# Altium PCB EFR32xG1x_DISC_WIDEBAND_REF_DES_A00.PcbDoc (part 2 of 2)
Units mm, origin at the board's own origin, x right, y up, seen from the top; angles counter-clockwise.
Board outline 30 x 45 mm, 4 copper layers (Top Layer, Signal Layer 2, Signal Layer 3, Bottom Layer), stack 1.606 mm thick; 90 components, 90 nets, 338 pads, 387 vias.
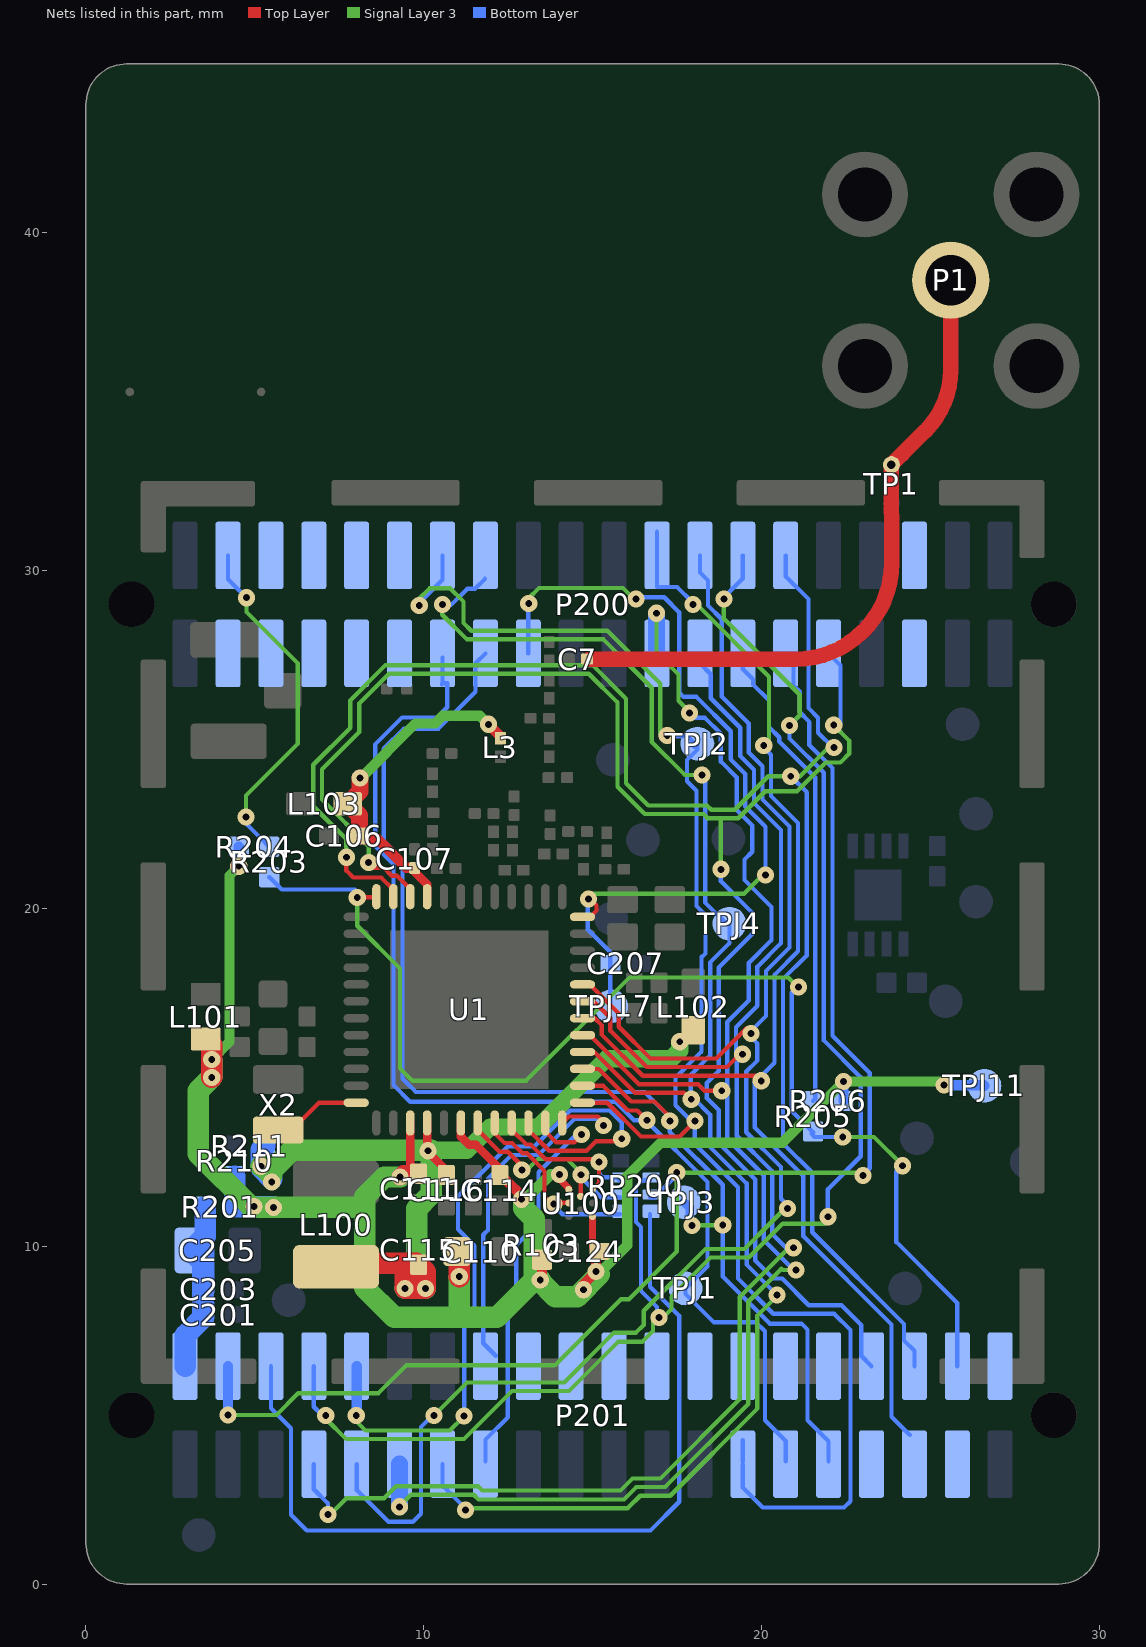
[diagram p4: the nets of this part, all layers, seen from the top]

## Via types
v1: diameter 0.508, hole 0.203, Top Layer to Bottom Layer, tented both sides, 387 vias

## Nets (pads, with @x,y where several pads share a name; then routed paths per layer and width w, separated by ;. In a path a pad name is that pad's centre, name@x,y a point inside that pad or via, vN(x,y) a via of type N, cw(c..) or ccw(c..) an arc to the next point about the centre after c; other vN are vias at no path point) (continued)
RADIO_PB15: U1.36 X2.1 | length 2.7
  Top Layer w0.127: X2.1@5.698,13.4 5.747,13.449 6.097,13.449 6.898,14.25 U1.36@8,14.25
RADIO_PC6: RP200.2 U1.43 U100.D2 | length 6.9
  Top Layer w0.127: U1.43@11.598,13.65 11.598,13.446 12.244,12.8 12.484,12.8 13.034,12.25 12.992,12.208 12.944,12.255 v1(12.903,12.255) ; U100.D2@14.648,11.55 14.648,12.051 14.584,12.116 14.596,12.128 14.609,12.116 v1(14.656,12.116)
  Signal Layer 3 w0.127: v1(12.903,12.255) 12.931,12.255 12.992,12.194 13.384,12.586 14.237,12.586 14.654,12.169 v1@14.601,12.116 ; v1(14.656,12.116) v1@14.601,12.116 ; v1@14.601,12.116 14.588,12.128 14.576,12.116 14.588,12.103 v1@14.601,12.116
  Bottom Layer w0.127: v1(14.656,12.116) 14.609,12.116 14.596,12.128 14.584,12.116 15.249,11.45 RP200.2@15.8,11.45
RADIO_PC7: RP200.1 U1.44 U100.C3 | length 5.7
  Top Layer w0.127: U1.44@12.1,13.65 12.098,13.35 12.392,13.056 12.617,13.056 12.922,12.751 13.056,12.751 13.576,12.23 13.576,11.472 v1@13.648,11.4 ; v1(13.85,11.25) 13.89,11.29 U100.C3@14.298,11.29
  Bottom Layer w0.127: v1@13.824,11.224 14.098,10.95 RP200.1@15.8,10.95
RADIO_PC8: RP200.3 U1.45 U100.E1 | length 5.1
  Top Layer w0.127: U1.45@12.6,13.65 12.598,13.45 13.038,13.01 13.165,13.01 13.602,12.573 v1@15.176,12.573 ; U100.E1@14.993,11.678 15.189,11.874 v1@15.189,12.471
  Bottom Layer w0.127: v1(15.189,12.497) 15.189,12.174 15.215,12.149 15.207,12.141 15.308,12.04 15.71,12.04 RP200.3@15.8,11.95
RADIO_PC9: P201.10 U1.46 | length 22.3
  Top Layer w0.127: U1.46@13.1,13.65 13.1,13.443 13.716,12.827 14.821,12.827 15.1,13.106 15.799,13.106 15.862,13.17 v1(15.862,13.183)
  Signal Layer 3 w0.127: v1(8.001,4.991) 7.861,4.991 7.848,4.978 8.28,4.547 10.772,4.547 11.189,4.964 v1(11.189,4.978)
  Bottom Layer w0.127: v1(8.001,4.991) 7.885,4.991 v1@8.014,5.119 ; P201.10@8.014,6.449 P201.10@8.015,6.45 ; v1@11.113,4.934 11.201,5.023 11.201,7.622 11.5,7.92 11.5,10.014 11.011,10.503 11.011,11.481 12.484,12.954 13.271,12.954 14.338,14.021 15.507,14.021 15.862,13.665 v1(15.862,13.183)
  Bottom Layer w0.305: v1@8.014,5.119 P201.10@8.014,6.449
RADIO_PC10: P201.15 U1.47 | length 12.5
  Top Layer w0.127: U1.47@13.6,13.65 13.6,13.4 13.919,13.081 14.459,13.081 14.668,13.291 v1(14.668,13.31)
  Bottom Layer w0.127: P201.15@11.825,3.635 11.825,4.275 12.484,4.934 12.484,8.234 12.738,8.488 12.738,10.033 13.399,10.693 13.399,12.192 14.516,13.31 v1(14.668,13.31)
RADIO_PC11: P201.16 U1.48 | length 11.3
  Top Layer w0.127: U1.48@14.098,13.65 U1.48@14.1,13.65 14.293,13.843 15.151,13.843 15.316,13.678 v1(15.316,13.576)
  Bottom Layer w0.127: P201.16@12.131,6.756 11.76,7.127 11.76,10.338 11.9,10.477 11.9,12 12.6,12.7 13.399,12.7 14.465,13.767 15.316,13.767 v1(15.316,13.576)
RADIO_PD13: P200.31 P201.34 U1.22 | length 49.9
  Top Layer w0.127: v1(8.369,21.361) 8.362,21.361 8.35,21.349 8.489,21.209 8.814,21.209 9.055,20.968 9.208,20.968 9.598,20.578 U1.22@9.598,20.35
  Signal Layer 3 w0.127: v1(8.369,21.361) 8.369,21.84 6.985,23.225 6.985,24.121 8.09,25.226 8.09,26.066 8.973,26.949 14.887,26.949 15.735,26.101 15.735,23.602 16.541,22.796 18.281,22.796 18.408,22.669 18.796,22.669 ; v1(18.796,21.158) 18.796,22.669 ; v1(22.136,25.425) 22.593,24.968 22.593,24.581 22.333,24.32 21.901,24.32 21.05,23.47 20.111,23.47 19.311,22.669 18.796,22.669
  Bottom Layer w0.127: v1@18.796,21.145 18.796,20.803 19.748,19.85 19.748,19.266 18.732,18.25 18.732,15.189 18.377,14.834 18.377,14.389 18.732,14.034 18.732,13.056 19.812,11.976 19.812,9.576 20.345,9.042 20.612,9.042 21.399,8.255 22.365,8.255 22.949,7.671 22.949,6.756 P201.34@23.255,6.45 ; v1(18.796,21.158) v1@18.86,21.158 ; P200.31@21.985,27.55 22.339,27.196 v1@22.339,25.463 ; v1(22.136,25.425) 22.149,25.425 v1@22.275,25.299
RADIO_PD14: P200.30 P201.36 U1.23 | length 52.3
  Top Layer w0.127: v1(7.709,21.514) 7.709,21.12 7.912,20.917 8.738,20.917 9.098,20.556 U1.23@9.1,20.35
  Signal Layer 3 w0.127: v1(7.709,21.514) 7.709,22.047 6.731,23.025 6.731,24.253 7.823,25.346 7.823,26.158 8.868,27.203 14.992,27.203 15.989,26.206 15.989,23.707 16.646,23.05 18.386,23.05 18.513,22.924 19.206,22.924 20.197,23.914 v1(20.866,23.914) 21.136,23.914 21.986,24.765 v1(22.149,24.765)
  Bottom Layer w0.127: P200.30@20.715,30.45 20.715,29.831 21.387,29.159 21.387,25.933 21.673,25.648 21.673,25.203 22.111,24.765 v1(22.149,24.765) ; v1(20.866,23.914) 21.336,23.444 21.336,18.605 20.637,17.907 20.637,13.043 21.5,12.18 21.5,10.415 24.219,7.696 24.219,7.214 24.525,6.907 P201.36@24.525,6.45
RADIO_PD15: P201.38 R203.1 R205.1 U1.24 | length 36.8
  Top Layer w0.127: v1(8.032,20.328) 8.522,20.328 8.558,20.364 8.585,20.337 U1.24@8.598,20.35
  Signal Layer 3 w0.127: v1(8.032,20.328) 8.032,19.488 9.296,18.224 9.296,15.265 9.665,14.897 13.03,14.897 16.091,17.958 20.79,17.958 v1@21.044,17.704 ; v1(22.403,13.233) 23.33,13.233 v1@24.168,12.395
  Bottom Layer w0.127: R203.1@5.425,20.925 5.431,20.925 5.795,20.561 7.963,20.561 8.032,20.492 v1(8.032,20.328) ; v1@21.057,17.678 20.892,17.513 20.892,14.008 R205.1@21.526,13.373 ; R205.1@21.48,13.335 21.563,13.235 v1@22.312,13.235 ; v1(24.168,12.383) 23.99,12.205 23.99,10.122 25.795,8.317 P201.38@25.795,6.45
  other v1: 21.095,17.678
RADIO_PF0: P200.14 P201.27 TPJ2.1 U1.1 | length 48.5
  Top Layer w0.127: U1.1@14.698,14.25 U1.1@14.7,14.25 14.998,14.25 15.43,14.249 16.434,13.246 17.577,13.246 v1@18.021,13.691
  Signal Layer 3 w0.127: v1(9.868,28.969) 9.868,29.172 10.171,29.475 10.784,29.475 11.176,29.083 11.176,28.448 11.405,28.219 15.436,28.219 17.005,26.65 v1@17.005,25.146
  Bottom Layer w0.127: v1(9.868,28.969) 9.868,29.043 10.555,29.73 P200.14@10.555,30.45 ; v1@17.209,25.26 v1(17.209,25.121) 17.234,25.095 17.818,25.095 TPJ2.1@17.958,24.956 ; TPJ2.1@17.907,24.88 TPJ2.1@18.003,24.784 ; v1(18.034,13.703) v1@18.021,13.703 ; TPJ2.1@18.1,24.88 18.1,24.704 17.793,24.397 17.793,23.768 18.075,23.485 18.075,20.072 18.339,19.808 18.339,18.669 18.237,18.567 ; 18.224,18.567 18.224,15.761 17.45,14.986 17.45,14.173 17.92,13.703 v1@18.021,13.703 ; P201.27@19.445,3.55 19.445,2.856 20.038,2.263 22.443,2.263 22.631,2.451 22.631,7.518 22.149,8.001 20.345,8.001 19.304,9.042 19.304,11.747 18.021,13.03 v1@18.021,13.703 ; P201.27@19.445,3.635 P201.27@19.445,4.255
RADIO_PF1: P200.13 P201.29 TPJ1.1 U1.2 | length 37.9
  Top Layer w0.127: U1.2@14.698,14.75 U1.2@14.7,14.75 15.311,14.75 16.04,14.021 16.319,14.021 v1(16.612,13.729)
  Bottom Layer w0.127: P200.13@10.541,26.632 10.554,26.645 P200.13@10.554,26.67 ; P200.13@10.541,26.67 P200.13@10.554,26.67 ; P200.13@10.554,27.432 P200.13@10.554,26.67 ; v1(16.612,13.729) v1@16.573,13.729 ; P201.29@20.715,3.635 20.715,4.235 20.1,4.85 20.1,7.484 19.837,7.747 18.593,7.747 17.75,8.59 TPJ1.1@17.75,8.75 18.402,9.402 18.402,11.9 v1@16.573,13.729 ; P200.13@10.554,26.67 10.693,26.67 10.693,25.959 10.389,25.654 9.36,25.654 8.56,24.854 8.56,21.844 9.106,21.298 9.106,14.77 9.601,14.275 15.675,14.275 16.221,13.729 v1@16.562,13.729 ; v1@16.562,13.729 16.568,13.735 v1@16.573,13.729 ; v1@16.562,13.729 v1@16.573,13.729
RADIO_PF2: P200.15 P201.31 TPJ3.1 U1.3 | length 40.9
  Top Layer w0.127: U1.3@14.7,15.25 15.179,15.25 16.142,14.287 16.828,14.287 17.272,13.843 17.259,13.83 17.285,13.805 v1(17.285,13.703)
  Signal Layer 3 w0.127: v1(17.945,10.617) 18.017,10.617 18.029,10.629 18.033,10.625 v1(18.85,10.625)
  Bottom Layer w0.127: P200.15@11.825,27.55 11.532,27.257 11.532,26.416 10.439,25.324 9.411,25.324 8.814,24.727 8.814,21.996 9.373,21.438 9.373,14.961 9.766,14.567 16.535,14.567 17.272,13.83 17.259,13.818 17.285,13.792 v1(17.285,13.703) 17.285,13.386 18.85,11.82 v1(18.85,10.625) 18.85,9.103 20.244,7.709 21.184,7.709 21.361,7.531 21.361,4.851 21.985,4.228 P201.31@21.985,3.635 ; v1@17.831,10.617 v1(17.945,10.617)
  Bottom Layer w0.254: TPJ3.1@17.7,11.3 17.869,11.131 17.869,10.693 v1(17.945,10.617)
RADIO_PF3: P200.16 P201.13 TPJ4.1 U1.4 | length 48.8
  Top Layer w0.127: U1.4@14.7,15.75 15.047,15.75 16.256,14.541 17.704,14.541 v1@17.907,14.338
  Signal Layer 3 w0.127: v1(10.55,29) 10.55,28.693 11.278,27.965 15.32,27.965 16.751,26.534 16.751,24.93 17.729,23.952 v1(18.237,23.952) ; v1(11.238,2.188) 11.298,2.248 16.04,2.248 16.408,2.616 17.297,2.616 19.875,5.194 19.875,7.95 20.485,8.56 v1(20.46,8.56)
  Bottom Layer w0.127: v1(10.55,29) 10.569,28.981 10.808,28.981 11.29,29.464 11.519,29.464 P200.16@11.811,29.756 ; P201.13@10.555,3.55 10.555,2.918 11.238,2.235 v1(11.238,2.188) ; v1(18.237,23.952) 18.329,23.86 18.329,20.177 18.923,19.583 TPJ4.1@19.025,19.583 ; TPJ4.1@19.05,19.55 19.05,18.974 18.479,18.402 18.479,15.646 17.907,15.075 17.907,14.376 17.996,14.376 18.479,13.894 18.479,12.941 19.558,11.862 19.558,9.461 v1(20.46,8.56)
  other v1: 17.92,14.351
RADIO_PF4: P200.23 P201.11 U1.5 | length 46.9
  Top Layer w0.127: U1.5@14.7,16.25 14.916,16.25 16.37,14.795 18.123,14.795 18.313,14.605 v1(18.821,14.605)
  Signal Layer 3 w0.127: v1@9.284,2.299 9.627,2.642 11.481,2.642 11.62,2.502 15.926,2.502 16.294,2.87 17.145,2.87 19.609,5.334 19.609,8.357 20.587,9.335 20.625,9.296 v1(21.018,9.296) ; v1(16.891,28.74) 16.891,27.572 17.539,26.924 17.539,26.149 17.831,25.857 v1@18.034,25.857
  Bottom Layer w0.127: v1(9.284,2.286) 9.284,2.245 v1@9.296,2.233 ; P201.11@9.296,2.629 v1@9.296,2.233 ; v1@9.317,2.228 9.309,2.22 v1@9.296,2.233 ; v1@17.958,25.641 18.326,25.641 18.796,25.171 18.796,24.346 19.266,23.876 19.266,22.911 19.723,22.454 19.723,21.679 19.494,21.45 19.494,20.841 20.295,20.041 20.295,19.063 19.621,18.39 19.621,17.272 18.986,16.637 18.986,13.183 20.066,12.103 20.066,10.185 20.921,9.33 20.925,9.335 20.963,9.296 v1(21.018,9.296)
  Bottom Layer w0.508: v1@9.284,2.299 P201.11@9.285,3.55 ; v1@16.891,28.727 16.891,27.564 P200.23@16.905,27.55
  other v1: 17.869,25.781
RADIO_PF5: P200.24 P201.35 U1.6 | length 38.1
  Top Layer w0.127: U1.6@14.698,16.75 U1.6@14.7,16.75 15.064,16.75 15.265,16.548 15.265,16.269 16.485,15.05 19.837,15.05 v1(19.99,14.897)
  Signal Layer 3 w0.127: v1(17.97,28.994) 18.085,28.994 20.218,26.86 20.218,24.981 v1(20.066,24.828) 20.066,24.867 v1@19.952,24.981
  Bottom Layer w0.127: P200.24@16.905,31.155 P200.24@16.905,30.45 16.905,29.526 16.916,29.515 17.501,29.515 17.932,29.083 v1@17.932,28.994 ; v1@20.066,25.019 v1(20.066,24.828) 20.066,24.765 20.282,24.549 20.282,23.332 21.082,22.532 21.082,18.732 20.383,18.034 20.383,15.433 19.99,15.04 v1(19.99,14.897) 19.847,14.897 19.799,14.849 19.799,13.513 21.234,12.078 21.234,10.3 23.849,7.686 23.849,4.952 P201.35@24.388,4.413
RADIO_PF6: P200.25 P201.7 U1.7 | length 46.5
  Top Layer w0.127: U1.7@14.7,17.25 15.033,17.25 15.519,16.764 15.519,16.383 16.599,15.303 18.978,15.303 19.406,15.731 19.431,15.705 v1(19.431,15.684)
  Signal Layer 3 w0.127: v1(7.163,2.057) 7.229,2.057 7.712,2.54 8.826,2.54 9.182,2.896 11.608,2.896 11.735,2.769 15.824,2.769 16.18,3.124 17.005,3.124 19.355,5.474 19.355,8.496 20.815,9.957 v1(20.942,9.957)
  Bottom Layer w0.127: P201.7@6.745,3.55 6.745,2.805 7.163,2.387 v1(7.163,2.057) ; P200.25@18.175,27.25 18.494,26.931 18.494,26.222 19.367,25.349 19.367,24.511 19.774,24.105 19.774,23.121 20.574,22.321 20.574,18.974 19.875,18.275 19.875,17.12 19.241,16.485 v1@19.241,15.596 ; v1(19.431,15.684) 19.329,15.684 v1@19.241,15.596 ; v1(20.942,9.957) 20.769,9.957 20.744,9.931 20.32,10.355 20.32,12.217 19.266,13.271 19.266,15.57 v1@19.241,15.596
RADIO_PF7: P200.26 P201.9 U1.8 | length 47.6
  Top Layer w0.127: U1.8@14.7,17.75 14.914,17.75 15.773,16.891 15.773,16.497 16.713,15.557 18.658,15.557 v1@19.54,16.439
  Signal Layer 3 w0.127: v1(10.3,4.991) 11.278,5.969 14.16,5.969 15.634,7.442 16.281,7.442 16.51,7.671 16.51,8.09 18.339,9.919 19.494,9.919 20.256,10.681 20.701,11.125 v1@20.853,11.125
  Bottom Layer w0.127: P201.9@8.015,3.55 8.015,2.78 8.954,1.841 9.677,1.841 9.919,2.083 9.919,4.648 v1@10.249,4.978 ; v1@10.249,4.991 v1(10.3,4.991) ; P200.26@18.175,30.45 18.175,29.945 18.415,29.705 18.415,28.969 18.821,28.562 18.821,26.276 19.621,25.476 19.621,24.616 20.028,24.21 20.028,23.226 20.828,22.426 20.828,18.847 20.13,18.148 20.13,16.815 19.685,16.37 v1(19.685,16.294) 19.685,16.192 19.875,16.002 19.875,15.5 19.545,15.17 19.545,13.373 20.574,12.344 20.574,11.405 v1@20.879,11.1
  other v1: 20.764,11.112
Tline: C7.2 P1.1 TP1.1 | length 19.6
  Top Layer w0.457: C7.2@14.91,27.379 21.004,27.379 ccw(c21.004,30.226) 23.851,30.226 TP1.1@23.845,33.135 TP1.1@23.854,33.144 ; TP1.1@23.851,33.147 24.155,33.452 24.162,33.452 24.856,34.146 ccw(c23.06,35.942) 25.6,35.942 P1.1@25.6,38.6
USB_VBUS: P200.35
USB_VREG: P200.36
VBIAS: C106.1 C107.1 L3.2 L103.2 U1.21 | length 10.1
  Top Layer w0.254: C107.1@9.728,21.086 10.1,20.715 U1.21@10.1,20.35
  Top Layer w0.305: C106.1@8.14,22.047 8.636,22.047 9.483,21.201 C107.1@9.728,21.201 ; v1(11.913,25.451) 12.268,25.095 L3.2@12.268,25.019
  Top Layer w0.508: L103.2@7.734,23.089 8.115,23.47 v1(8.115,23.863) ; L103.2@7.75,23.1 8.103,22.747 8.103,22.187 C106.1@8.128,22.162
  Signal Layer 3 w0.305: v1(8.115,23.863) 8.115,23.838 9.754,25.476 10.338,25.476 10.566,25.705 11.659,25.705 v1(11.913,25.451)
VDCDC: C115.1 C116.1 L100.2 L102.1 R211.2 U1.40 | length 27.5
  Top Layer w0.254: U1.40@10.098,13.65 v1@10.098,12.821 ; v1(10.122,12.827) 10.189,12.827 10.194,12.821 v1@10.098,12.821 ; C116.1@10.675,12.15 10.675,12.244 v1@10.098,12.821
  Top Layer w0.635: L100.2@7.398,9.5 C115.1@9.798,9.5 ; C115.1@9.798,9.5 9.448,9.15 v1(9.448,8.75) v1(10.048,8.75) 10.048,9.25 C115.1@9.798,9.5
  Signal Layer 3 w0.508: v1@10.225,12.84 11.278,12.84 11.963,13.525 13.386,13.525 15.41,15.55 17.328,15.55 17.577,15.799 v1@17.577,15.97
  Signal Layer 3 w0.635: v1(5.182,12.37) 5.182,12.372 5.205,12.395 5.5,12.1 5.5,12.25 6.09,12.84 10.225,12.84 10.225,11.546 9.792,11.112 9.792,9.094 9.748,9.05 ; v1@10.003,8.795 9.748,9.05 ; v1(10.048,8.75) v1(9.448,8.75) 9.748,9.05
  Bottom Layer w0.635: R211.2@5.3,12.975 5.182,12.857 v1(5.182,12.37) 5.182,12.319 v1@5.5,12.001
  other v1: 5.5,11.9 17.577,16.053
VMCU: C110.1 C111.1 C114.1 C124.1 L101.1 R103.1 R201.2 R204.1 R206.1 R210.2 TPJ11.1 U1.39 U1.42 U100.A1 U100.E3 | length 61.5
  Top Layer w0.203: v1@13.919,12.014 13.995,12.014 14.293,11.716 U100.E3@14.293,11.678 ; v1@14.017,12.128 v1(14.021,12.128) ; U100.A1@14.998,10.871 14.998,9.95 C124.1@15.098,9.85
  Top Layer w0.254: U1.39@9.598,13.65 9.598,12.4 C111.1@9.848,12.15 ; U1.42@11.098,13.65 11.098,13.25 11.348,13 11.548,13 C114.1@12.348,12.2
  Top Layer w0.305: C114.1@12.348,12.2 12.348,12.036 12.984,11.4 12.976,11.392 v1(12.89,11.392) ; v1(13.45,9) 13.5,9.05 R103.1@13.5,9.6 ; v1(14.732,8.712) 14.732,8.822 14.701,8.853 v1(15.098,9.25) C124.1@15.098,9.85
  Top Layer w0.508: v1(9.298,12.05) 9.398,12.15 C111.1@9.848,12.15
  Top Layer w0.635: L101.1@3.55,16.135 3.725,15.96 v1(3.725,15.525) v1(3.725,15) ; v1(11.05,9.1) C110.1@11.05,9.85
  Signal Layer 3 w0.305: v1(3.725,15.525) 4.25,16.05 4.25,20.975 v1(4.525,21.25) ; v1(15.098,9.25) 15.244,9.25 16.025,10.03 16.025,12.075 17.011,13.061 20.611,13.061 v1(22.425,14.875) 25.397,14.875 25.502,14.77 v1@25.413,14.77 ; v1(25.4,14.77) v1@25.413,14.77 ; v1@25.425,14.757 v1@25.413,14.77
  Signal Layer 3 w0.33: v1(12.89,11.392) 13.018,11.392 13.754,12.128 v1(14.021,12.128)
  Signal Layer 3 w0.635: v1(3.725,15.525) v1(3.725,15) 3.325,14.6 3.325,12.733 4.883,11.175 v1(4.975,11.175) 5,11.15 v1(5.55,11.15) 8.196,11.15 8.248,11.202 ; v1(9.298,12.05) 8.837,12.05 8.248,11.461 8.248,11.202 ; 11.05,8 v1(11.05,9.1) ; v1@12.954,11.34 12.954,11.125 13.271,10.808 13.271,9.129 v1@13.4,9 ; v1(13.45,9) v1@13.4,9 ; v1@15.202,9.169 14.541,8.509 13.891,8.509 v1@13.4,9 ; 8.248,11.202 8.248,8.775 9.124,7.899 12.167,7.899 13.267,9 v1@13.4,9
  Bottom Layer w0.305: v1(4.525,21.25) R204.1@4.525,21.825 ; R206.1@22.425,14.3 v1(22.425,14.875) ; v1(25.4,14.77) 26.58,14.77 TPJ11.1@26.6,14.75
  Bottom Layer w0.635: R210.2@4.4,12.075 4.4,11.2 R201.2@4.425,11.175 v1(4.975,11.175) ; v1@5.073,11.175 v1(4.975,11.175) ; v1(5.55,11.15) 5.537,11.163 4.975,11.163 v1(4.975,11.175)
VMCU_IN: C201.1 C203.1 C205.1 P201.2 R201.1 | length 7.3
  Bottom Layer w0.635: P201.2@2.935,6.45 2.935,7.36 C201.1@3.488,7.913 ; 3.488,8.275 C201.1@3.488,7.913 ; C205.1@3.5,10.25 3.488,10.238 3.488,8.688 C203.1@3.463,8.663 ; R201.1@3.525,11.175 3.525,10.3 C205.1@3.1,9.875 3.463,9.512 C203.1@3.463,8.663 ; C203.1@3.463,8.663 3.463,7.938 C201.1@3.488,7.913
VRF_IN: P201.40
WSTK_F4: C207.1 P200.17 TPJ17.1 U1.12 | length 25.5
  Top Layer w0.127: U1.12@14.7,19.75 14.924,19.75 15.113,19.939 15.113,20.091 v1@14.91,20.295
  Signal Layer 3 w0.127: v1(13.106,29.032) 13.106,29.185 13.411,29.489 15.9,29.489 v1@16.256,29.134 ; v1(14.876,20.276) 14.876,20.349 14.961,20.434 19.482,20.434 v1@20.066,21.018
  Bottom Layer w0.127: P200.17@13.095,27.55 13.095,29.046 v1@13.106,29.058 ; v1(14.876,20.276) 14.859,20.259 14.859,19.367 15.525,18.701 C207.1@15.525,18.375 15.525,17.125 TPJ17.1@15.55,17.1 ; v1@16.307,29.21 17.12,29.21 17.564,28.765 17.564,26.391 17.691,26.264 18.072,26.264 19.088,25.248 19.088,24.413 19.52,23.981 19.52,23.016 20.117,22.419 v1(20.117,20.993)
  other v1: 16.281,29.159
WSTK_F14: P200.27 R205.2 R206.2 | length 14.2
  Bottom Layer w0.127: P200.27@19.445,27.55 19.445,27.088 19.748,26.784 19.748,26.632 20.218,26.162 20.218,25.375 20.523,25.07 20.523,24.943 21.59,23.876 21.59,14.365 R205.2@21.525,14.3
WSTK_F15: P200.28 P201.8 RP200.6 | length 46.7
  Signal Layer 3 w0.127: v1(7.099,4.991) 7.099,4.895 7.701,4.293 11.189,4.293 12.611,5.715 14.3,5.715 15.761,7.175 16.472,7.175 16.789,7.493 16.789,7.76 v1@16.929,7.899 ; v1(16.967,7.887) 17.081,7.887 17.335,8.141 17.335,8.509 18.491,9.665 19.621,9.665 20.625,10.668 21.869,10.668 v1@21.965,10.763 ; v1(18.885,29.159) 18.885,28.575 21.133,26.327 21.133,25.717 v1(20.828,25.413)
  Bottom Layer w0.127: P201.8@6.745,6.45 6.745,5.249 7.003,4.991 v1(7.099,4.991) ; RP200.6@16.7,11.95 16.471,11.95 16.281,11.76 16.281,10.719 16.434,10.566 16.434,8.674 16.904,8.204 16.904,7.95 v1(16.967,7.887) ; v1@18.872,29.197 19.445,29.77 P200.28@19.445,30.45 ; v1(20.828,25.413) 20.828,25.032 21.844,24.016 21.844,16.091 22.936,14.999 22.936,12.662 21.958,11.684 21.958,10.884 v1(21.971,10.871)
WSTK_F16: P200.29 P201.4 RP200.7 | length 42.3
  Signal Layer 3 w0.127: v1(4.204,5.004) 5.639,5.004 6.286,5.651 8.661,5.651 9.487,6.477 13.881,6.477 15.837,8.433 16.078,8.433 17.491,9.845 v1(17.491,12.179) 22.911,12.179 v1(23,12.09)
  Bottom Layer w0.127: v1(4.204,5.004) v1@4.205,5.005 ; RP200.7@16.7,11.45 16.835,11.45 17.491,12.106 v1(17.491,12.179) ; P200.29@20.715,27.55 20.948,27.317 20.948,26.602 21.133,26.417 21.133,25.806 21.406,25.533 21.406,25.514 ; 21.412,25.514 21.412,24.841 22.098,24.155 22.098,16.231 23.203,15.126 23.203,12.306 23,12.103 v1(23,12.09)
  Bottom Layer w0.305: v1@4.205,5.005 P201.4@4.205,6.45
WSTK_P3: P201.6 RP200.8 | length 25.6
  Bottom Layer w0.127: P201.6@5.475,6.45 5.475,5.206 6.071,4.61 6.071,2.051 6.534,1.587 16.713,1.587 17.563,2.437 17.563,7.939 16.7,8.802 RP200.8@16.7,10.95
WSTK_P15: P201.18
WSTK_P17: P201.20
WSTK_P19: P201.22
WSTK_P21: P201.24
WSTK_P23: P201.26
WSTK_P25: P201.28
WSTK_P27: P201.30
WSTK_P29: P201.32
WSTK_P30: P201.33
WSTK_P34: P201.37
WSTK_P36: P200.3
WSTK_P37: P200.4 R203.2 R204.2 | length 10.4
  Signal Layer 3 w0.127: v1(4.737,22.708) 4.737,23.343 6.274,24.879 6.274,27.254 4.75,28.778 v1(4.75,29.2)
  Bottom Layer w0.127: P200.4@4.205,30.45 4.205,29.745 v1(4.75,29.2) ; v1(4.737,22.708) 4.737,22.568 4.712,22.543 5.182,22.073 R203.2@5.425,21.825
WSTK_P38: P200.5
WSTK_P39: P200.6
WSTK_P40: P200.7
WSTK_P41: P200.8
WSTK_P42: P200.9
WSTK_P43: P200.10
WSTK_P44: P200.11
WSTK_P45: P200.12
pads on no net: P200.M1 P200.M2 P201.M1 P201.M2 RP200.4 RP200.5 TPJ9.1 TPJ18.1 TPJ19.1 TPJ20.1 U1.49 U100.C1 U200.9

## Polygon pours and split planes (outlines as drawn)
GND on Bottom Layer "GND_L4" (solid, remove dead copper, pour order 24): 0.605,34.64 20.99,34.64 ccw(c20.99,35.507) 21.857,35.507 21.857,40.54 23.657,42.34 27.557,42.34 29.357,40.54 29.355,1.155 cw(c28.79,1.155) 28.79,0.59 1.255,0.595 cw(c1.255,1.245) 0.605,1.245
GND on Top Layer "GND_L1" (solid, remove dead copper, pour order 29): 0.605,34.64 20.99,34.64 ccw(c20.99,35.507) 21.857,35.507 21.857,40.54 23.657,42.34 27.557,42.34 29.357,40.54 29.355,1.155 cw(c28.79,1.155) 28.79,0.59 1.255,0.595 cw(c1.255,1.245) 0.605,1.245
GND on Signal Layer 2 "GND_L2" (solid, remove dead copper, pour order 27): 0.605,34.64 20.99,34.64 ccw(c20.99,35.507) 21.857,35.507 21.857,40.54 23.657,42.34 27.557,42.34 29.357,40.54 29.355,1.155 cw(c28.79,1.155) 28.79,0.59 1.255,0.595 cw(c1.255,1.245) 0.605,1.245
GND on Signal Layer 3 "GND_L3" (solid, remove dead copper, pour order 25): 0.605,34.64 20.99,34.64 ccw(c20.99,35.507) 21.857,35.507 21.857,40.54 23.657,42.34 27.557,42.34 29.357,40.54 29.355,1.155 cw(c28.79,1.155) 28.79,0.59 1.255,0.595 cw(c1.255,1.245) 0.605,1.245

## Other copper
Top Layer:
  pour cut-out: 9.119,26.913 9.944,26.913 9.944,25.576 10.693,24.827 10.693,21.804 10.973,21.525 10.973,21.246 11.151,21.246 11.151,23.063 11.302,23.214 11.733,23.214 12.243,23.724 13.284,23.724 13.284,27.508 13.486,27.71 14.122,27.71 14.122,23.724 15.367,23.724 15.926,23.165 15.926,21.839 15.748,21.661 15.748,20.955 15.177,20.383 14.741,20.383 14.376,20.019 14.106,20.019 14.106,14.019 10.231,14.019 10.231,10.759 8.835,10.759 8.255,11.34 8.106,11.34 8.106,21.402 9.169,22.465 10.033,22.465 10.033,23.089 9.881,23.242 9.881,24.294 9.119,25.056
Signal Layer 2:
  pour cut-out: 3.027,27.288 3.027,25.588 5.13,25.588 5.13,25.856 6.426,25.857 6.426,27.026 5.131,27.026 5.131,27.287
  pour cut-out: 11.976,20.358 11.976,20.98 11.049,21.907 11.049,23.011 11.203,23.165 11.684,23.165 12.243,23.724 15.367,23.724 15.926,23.165 15.926,21.844 15.748,21.666 15.748,20.904 15.113,20.269 14.607,20.269 14.199,19.861 13.155,19.861 ccw(c12.825,-2971.506) 12.473,19.861
Signal Layer 3:
  pour cut-out: 11.976,20.358 11.976,20.98 11.049,21.92 11.049,22.962 11.303,23.216 11.735,23.216 12.243,23.724 15.367,23.724 15.926,23.165 15.926,21.844 15.748,21.666 15.748,20.904 15.138,20.295 14.632,20.295 14.58,20.242 14.199,19.861 13.155,19.861 ccw(c12.814,-1646.039) 12.473,19.861
Bottom Layer:
  pour cut-out: 23.845,33.935 cw(c23.845,33.135) 24.645,33.135 cw(c23.845,33.135) 23.845,32.335 cw(c23.845,33.135) 23.045,33.135 cw(c23.845,33.135)

## Silkscreen, mask and mechanical layers (free items; w line width, h text height)
Top Overlay:
  the board outline again, w0.1
  text "EFR32xG1x_DISC_WIDEBAND" at 0.787,41.402 h2
  text "_REF_DES_A00" at 0.787,39.421 h2
Bottom Overlay:
  lines w0.1: 0,1.2 ccw(c1.2,1.2) 1.2,0 28.8,0 ccw(c28.8,1.2) 30,1.2 30,43.8 ccw(c28.8,43.8) 28.8,45 1.2,45 ccw(c1.2,43.8) 0,43.8 0,1.2
  lines w0.152: 3.95,11.925 3.95,11.625 4.25,11.625 ; 3.95,13.175 3.95,13.475 4.25,13.475 ; 4.075,21.65 4.075,21.35 4.375,21.35 ; 4.075,22 4.075,22.3 4.375,22.3 ; 4.6,11.625 4.9,11.625 4.9,11.925 ; 4.625,21.35 4.925,21.35 4.925,21.05 ; 4.9,12.175 4.9,12.475 5.2,12.475 ; 4.925,20.75 4.925,20.425 5.225,20.425 ; 5.5,12.475 5.825,12.475 5.825,12.775 ; 5.5,13.475 5.825,13.475 5.825,13.175 ; 5.625,20.425 5.925,20.425 5.925,20.75 ; 5.625,22.3 5.925,22.3 5.925,22 ; 21.075,13.25 21.075,12.95 21.375,12.95 ; 21.075,14.5 21.075,14.8 21.375,14.8 ; 21.725,12.95 22.025,12.95 22.025,13.25 ; 22.025,13.5 22.025,13.8 22.325,13.8 ; 22.625,13.8 22.95,13.8 22.95,14.1 ; 22.625,14.8 22.95,14.8 22.95,14.5
  text "BOARD INFO" at 20.55,43.35 h1.52
  text "Sensor Enable" at 9.45,22.85 h1.52
  text "PD15" at 8.534,21.539 h1.14
  text "ON" at 3.8,21.475 h1.14
  text "Disp Enable" at 25.275,15.125 h1.52
  text "ON" at 24.6,13.95 h1.14
  text "PAVDD" at 6.85,13.9 h1.52
  text "PD15" at 20.95,13.475 h1.14
  text "VDCDC" at 9.6,12.6 h1.14
  text "VMCU" at 3.825,12.15 h1.14
Top Solder:
  the board outline again, w1
Bottom Solder:
  the board outline again, w1
BOARD OUTLINE 1:
  the board outline again, w0.1
Mechanical 2:
  lines w0.1: -0.5,0 0.5,0 ; 0,-0.5 0,0.5
EXT_SILKP 19:
  text "Mighty Gecko" at 0.85,41.4 h4.5
  text "2.4 GHz" at 0.7,39 h2.1
  text "868 / 915 MHz" at 11.5,39 h2.1
  text "13  dBm" at 0.7,37 h2.1
  text "14 dBm" at 16.5,37 h2.1
EXT_SILKP 20:
  lines w0.152: 3.95,11.925 3.95,11.625 4.25,11.625 ; 3.95,13.175 3.95,13.475 4.25,13.475 ; 4.075,21.65 4.075,21.35 4.375,21.35 ; 4.075,22 4.075,22.3 4.375,22.3 ; 4.6,11.625 4.9,11.625 4.9,11.925 ; 4.625,21.35 4.925,21.35 4.925,21.05 ; 4.9,12.175 4.9,12.475 5.2,12.475 ; 4.925,20.75 4.925,20.425 5.225,20.425 ; 5.5,12.475 5.825,12.475 5.825,12.775 ; 5.5,13.475 5.825,13.475 5.825,13.175 ; 5.625,20.425 5.925,20.425 5.925,20.75 ; 5.625,22.3 5.925,22.3 5.925,22 ; 21.075,13.25 21.075,12.95 21.375,12.95 ; 21.075,14.5 21.075,14.8 21.375,14.8 ; 21.725,12.95 22.025,12.95 22.025,13.25 ; 22.025,13.5 22.025,13.8 22.325,13.8 ; 22.625,13.8 22.95,13.8 22.95,14.1 ; 22.625,14.8 22.95,14.8 22.95,14.5
  lines w0.154: 1.5,38 1.5,37 2.5,37 ; 1.5,42 1.5,43 2.5,43 ; 19.5,37 20.5,37 20.5,38 ; 19.5,43 20.5,43 20.5,42
  text "BOARD INFO" at 20.55,43.35 h1.52
  text "Sensor Enable" at 9.45,22.85 h1.52
  text "PCB4150C Rev C02" at 29.3,22 h1.52 r90
  text "ON" at 3.8,21.475 h1.14
  text "PD15" at 8.6,21 h1.14
  text "Disp Enable" at 25.275,15.125 h1.52
  text "ON" at 24.6,13.95 h1.14
  text "PAVDD" at 6.85,13.9 h1.52
  text "PD15" at 20.95,13.475 h1.14
  text "VDCDC" at 9.6,12.6 h1.14
  text "VMCU" at 3.825,12.15 h1.14
EXT_SILKP 23:
  text "Mighty Gecko" at 0.85,41.4 h4.5
  text "2.4 GHz / 915 MHz" at 0.9,38.2 h3
  text "19.5 dBm" at 0.9,35.5 h3
EXT_SILKS 24:
  lines w0.152: 3.95,11.925 3.95,11.625 4.25,11.625 ; 3.95,13.175 3.95,13.475 4.25,13.475 ; 4.075,21.65 4.075,21.35 4.375,21.35 ; 4.075,22 4.075,22.3 4.375,22.3 ; 4.6,11.625 4.9,11.625 4.9,11.925 ; 4.625,21.35 4.925,21.35 4.925,21.05 ; 4.9,12.175 4.9,12.475 5.2,12.475 ; 4.925,20.75 4.925,20.425 5.225,20.425 ; 5.5,12.475 5.825,12.475 5.825,12.775 ; 5.5,13.475 5.825,13.475 5.825,13.175 ; 5.625,20.425 5.925,20.425 5.925,20.75 ; 5.625,22.3 5.925,22.3 5.925,22 ; 21.075,13.25 21.075,12.95 21.375,12.95 ; 21.075,14.5 21.075,14.8 21.375,14.8 ; 21.725,12.95 22.025,12.95 22.025,13.25 ; 22.025,13.5 22.025,13.8 22.325,13.8 ; 22.625,13.8 22.95,13.8 22.95,14.1 ; 22.625,14.8 22.95,14.8 22.95,14.5
  text "BOARD INFO" at 20.55,43.35 h1.52
  text "PCB4150B Rev C01" at 29.4,25.3 h2.03 r90
  text "Sensor Enable" at 9.45,22.85 h1.52
  text "ON" at 3.8,21.475 h1.14
  text "WSTK_P37" at 11.475,21.025 h1.14
  text "Disp Enable" at 25.275,15.125 h1.52
  text "ON" at 24.6,13.95 h1.14
  text "PAVDD" at 6.85,13.9 h1.52
  text "WSTK_P35" at 20.95,13.475 h1.14
  text "VDCDC" at 9.6,12.6 h1.14
  text "VMCU" at 3.825,12.15 h1.14
Mechanical 26:
  lines w0.2: -125.405,-47.962 -120.405,-47.962 ; -125.405,-0.962 -120.405,-0.962 ; -125.393,46.038 -120.405,46.038 ; -54.197,-94.993 -54.197,-89.993 ; -54.197,90.007 -54.197,95.007 ; 17.103,-94.993 17.103,-89.993 ; 17.103,90.007 17.103,95.007 ; 88.303,-94.993 88.303,-89.993 ; 88.303,90.007 88.303,95.007 ; 154.595,-47.962 159.595,-47.962 ; 154.595,-0.962 159.595,-0.962 ; 154.595,46.038 159.583,46.038 ; -125.393,-94.993 -125.393,94.999 159.595,94.999 159.595,-94.993 -125.393,-94.993 ; -120.405,-89.993 -120.405,90.007 154.595,90.007 154.595,-89.993 -120.405,-89.993
  text "1" at -92.505,91.578 h1.52
  text "2" at -20.197,91.578 h1.52
  text "3" at 52.403,91.578 h1.52
  text "4" at 123.203,91.578 h1.52
  text "D" at 156.593,72.438 h1.52
  text "D" at -123.518,71.233 h1.52
  text "C" at -123.518,23.738 h1.52
  text "C" at 156.466,23.738 h1.52
  text "B" at -123.518,-23.862 h1.52
  text "B" at 156.466,-23.862 h1.52
  text "A" at -123.518,-71.362 h1.52
  text "A" at 156.466,-71.362 h1.52
  text "1" at -91.285,-93.435 h1.52
  text "2" at -20.197,-93.435 h1.52
  text "3" at 52.103,-93.435 h1.52
  text "4" at 122.803,-93.435 h1.52
Mechanical 27:
  circle w0.152: c70.608,-68.539 r0.762
  circle w0.152: c70.608,-68.539 r1.778
  circle w0.254: c38.623,-82.995 r2.962
  lines w0.152: 59.609,-68.539 66.975,-68.539 ; 68.322,-68.539 72.894,-68.539 ; 60.371,-69.301 66.188,-70.317 66.213,-66.761 60.371,-67.777 60.371,-69.301
  lines w0.2: 34.575,-89.929 34.575,-63.069 74.589,-63.069 ; 34.575,-75.705 154.539,-75.705 ; 34.589,-72.069 74.589,-72.069 ; 54.869,-89.878 54.869,-75.781 ; 54.869,-72.022 54.869,-63.107 ; 134.589,-75.68 134.589,-72.069 ; 144.589,-72.069 144.589,-63.069 ; 154.589,-72.069 74.589,-72.069 ; 154.589,-63.069 74.589,-63.069 ; 74.589,-72.069 74.589,-63.069
  text "SIZE" at 36.589,-65.069 h1.52
  text "DOC NO" at 76.589,-65.069 h1.52
  text "REV" at 146.589,-65.069 h1.52
  text "PROJECTION" at 55.885,-65.418 h1.52
  text "A00" at 146.309,-69.99 h2.54
  text "A4" at 39.239,-70.444 h2.54
  text "REF" at 36.589,-74.069 h1.52
  text "SHEET" at 135.589,-74.069 h1.52
  text "1 of 2" at 145.43,-75.106 h1.52
  text "This drawing is confidential and is supplied on the express" at 55.352,-78.677 h1.52
  text "condition that it shall not be loaned, copied or disclosed to any" at 55.352,-81.217 h1.52
  text "other person or used for any purpose without the written consent of" at 55.352,-83.757 h1.52
  text "C" at 38.029,-84.011 h2.03
  text "2016" at 43.109,-84.163 h2.54
  text "SILICON LABS" at 55.784,-88.05 h2.54
Mechanical 28:
  lines w0.2: -125.404,-47.963 -120.404,-47.963 ; -125.404,-0.963 -120.404,-0.963 ; -125.392,46.037 -120.404,46.037 ; 154.596,-47.963 159.596,-47.963 ; 154.596,46.037 159.596,46.037
  lines w0.203: -120.429,-89.995 -120.429,90.005 ; -120.404,-89.995 154.596,-89.995 154.596,90.005 -120.404,90.005 ; -54.196,-94.995 -54.196,-89.995 ; -54.196,90.005 -54.196,95.005 ; 17.104,-94.995 17.104,-89.995 ; 17.104,90.005 17.104,95.005 ; 88.304,-94.995 88.304,-89.995 ; 88.304,90.005 88.304,95.005 ; -125.392,-94.995 -125.392,94.997 159.596,94.997 159.596,-94.995 -125.392,-94.995
  text "4" at -91.487,91.577 h1.52
  text "3" at -19.18,91.577 h1.52
  text "2" at 53.42,91.577 h1.52
  text "1" at 124.22,91.577 h1.52
  text "D" at 157.61,72.437 h1.52
  text "D" at -122.501,71.232 h1.52
  text "C" at -122.501,23.737 h1.52
  text "C" at 157.61,22.137 h1.52
  text "B" at -122.501,-23.863 h1.52
  text "B" at 157.61,-24.963 h1.52
  text "A" at 156.592,-71.287 h1.52
  text "A" at -122.501,-71.363 h1.52
  text "A" at 157.483,-71.363 h1.52
  text "4" at -90.268,-93.437 h1.52
  text "3" at -19.18,-93.437 h1.52
  text "2" at 52.967,-93.437 h1.52
  text "1" at 123.82,-93.437 h1.52
Mechanical 29:
  circle w0.152: c-36.251,-68.603 r0.762
  circle w0.152: c-36.251,-68.603 r1.778
  circle w0.254: c-4.266,-83.059 r2.962
  lines w0.152: -38.537,-68.603 -33.965,-68.603 ; -32.619,-68.603 -25.253,-68.603 ; -31.857,-66.825 -31.831,-70.381 -26.015,-69.365 -26.015,-67.841 -31.857,-66.825
  lines w0.2: -120.232,-72.134 -40.232,-72.134 ; -120.232,-63.134 -40.232,-63.134 ; -120.182,-75.769 -0.218,-75.769 ; -110.232,-72.134 -110.232,-63.134 ; -100.232,-75.744 -100.232,-72.134 ; -20.512,-89.943 -20.512,-75.846 ; -20.512,-72.086 -20.512,-63.171 ; -0.232,-72.134 -40.232,-72.134 ; -0.232,-63.134 -40.232,-63.134 ; -0.218,-89.993 -0.218,-63.069 ; -40.232,-72.134 -40.232,-63.134
  text "REV" at -112.232,-65.134 h1.52
  text "DOC NO" at -42.232,-65.134 h1.52
  text "SIZE" at -2.232,-65.134 h1.52
  text "PROJECTION" at -21.528,-65.482 h1.52
  text "A00" at -111.952,-70.054 h2.54
  text "A4" at -4.882,-70.508 h2.54
  text "SHEET" at -101.232,-74.134 h1.52
  text "REF" at -2.232,-74.134 h1.52
  text "2 of 2" at -110.92,-75.106 h1.52
  text "This drawing is confidential and is supplied on the express" at -20.995,-78.741 h1.52
  text "condition that it shall not be loaned, copied or disclosed to any" at -20.995,-81.281 h1.52
  text "other person or used for any purpose without the written consent of" at -20.995,-83.821 h1.52
  text "C" at -3.672,-84.075 h2.03
  text "2016" at -8.752,-84.228 h2.54
  text "SILICON LABS" at -21.427,-88.114 h2.54
Mechanical 30:
  lines w0.2: 34.575,-63.069 34.575,-42.23 154.575,-42.23 ; 34.575,-59.134 74.575,-59.134 ; 34.575,-55.134 74.575,-55.134 154.575,-55.135 ; 34.575,-51.134 74.575,-51.134 ; 74.575,-47.134 154.575,-47.134 ; 74.581,-63.069 74.581,-42.23 ; 74.581,-42.219 74.581,-32.025 154.625,-32.025
  text "CUSTOMER" at 75.683,-44.146 h1.27
  text "PROJECT NO" at 36.059,-45.162 h1.52
  text "SILICON LABS" at 93.125,-46 h2.5
  text "DRAWING TITLE" at 75.912,-49.074 h1.52
  text "DATE" at 36.059,-53.29 h1.52
  text "EFR32xG1x_DISC_WIDEBAND_REF_DES" at 75.825,-53.325 h1.8
  text "2020-10-26" at 54.347,-54.306 h1.52
  text "SHEET NAME" at 75.709,-57.227 h1.52
  text "DRAWN" at 36.059,-57.354 h1.52
  text "CHECK" at 36.059,-61.418 h1.52

## Text inside footprints (layer, text, board x,y; h text height)
P200: Mechanical 12 "2" at 2.87,29.794 h0.4; Mechanical 12 "1" at 2.819,27.915 h0.4; Mechanical 12 "40" at 27.432,29.794 h0.4
P201: Mechanical 12 "2" at 2.972,5.791 h0.4; Mechanical 12 "1" at 2.87,3.759 h0.4; Mechanical 12 "40" at 27.381,5.715 h0.4